# Altium PCB Sampler.PCBDOC (part 5 of 11)
Units mm, origin at the board's own origin, x right, y up, seen from the top; angles counter-clockwise.
Board outline 222.9 x 100 mm, 4 copper layers (L1, P2, L3, L4), stack 1.6 mm thick; 754 components, 442 nets, 2347 pads, 1230 vias.
Unrouted connection lines stored in the file: 10.
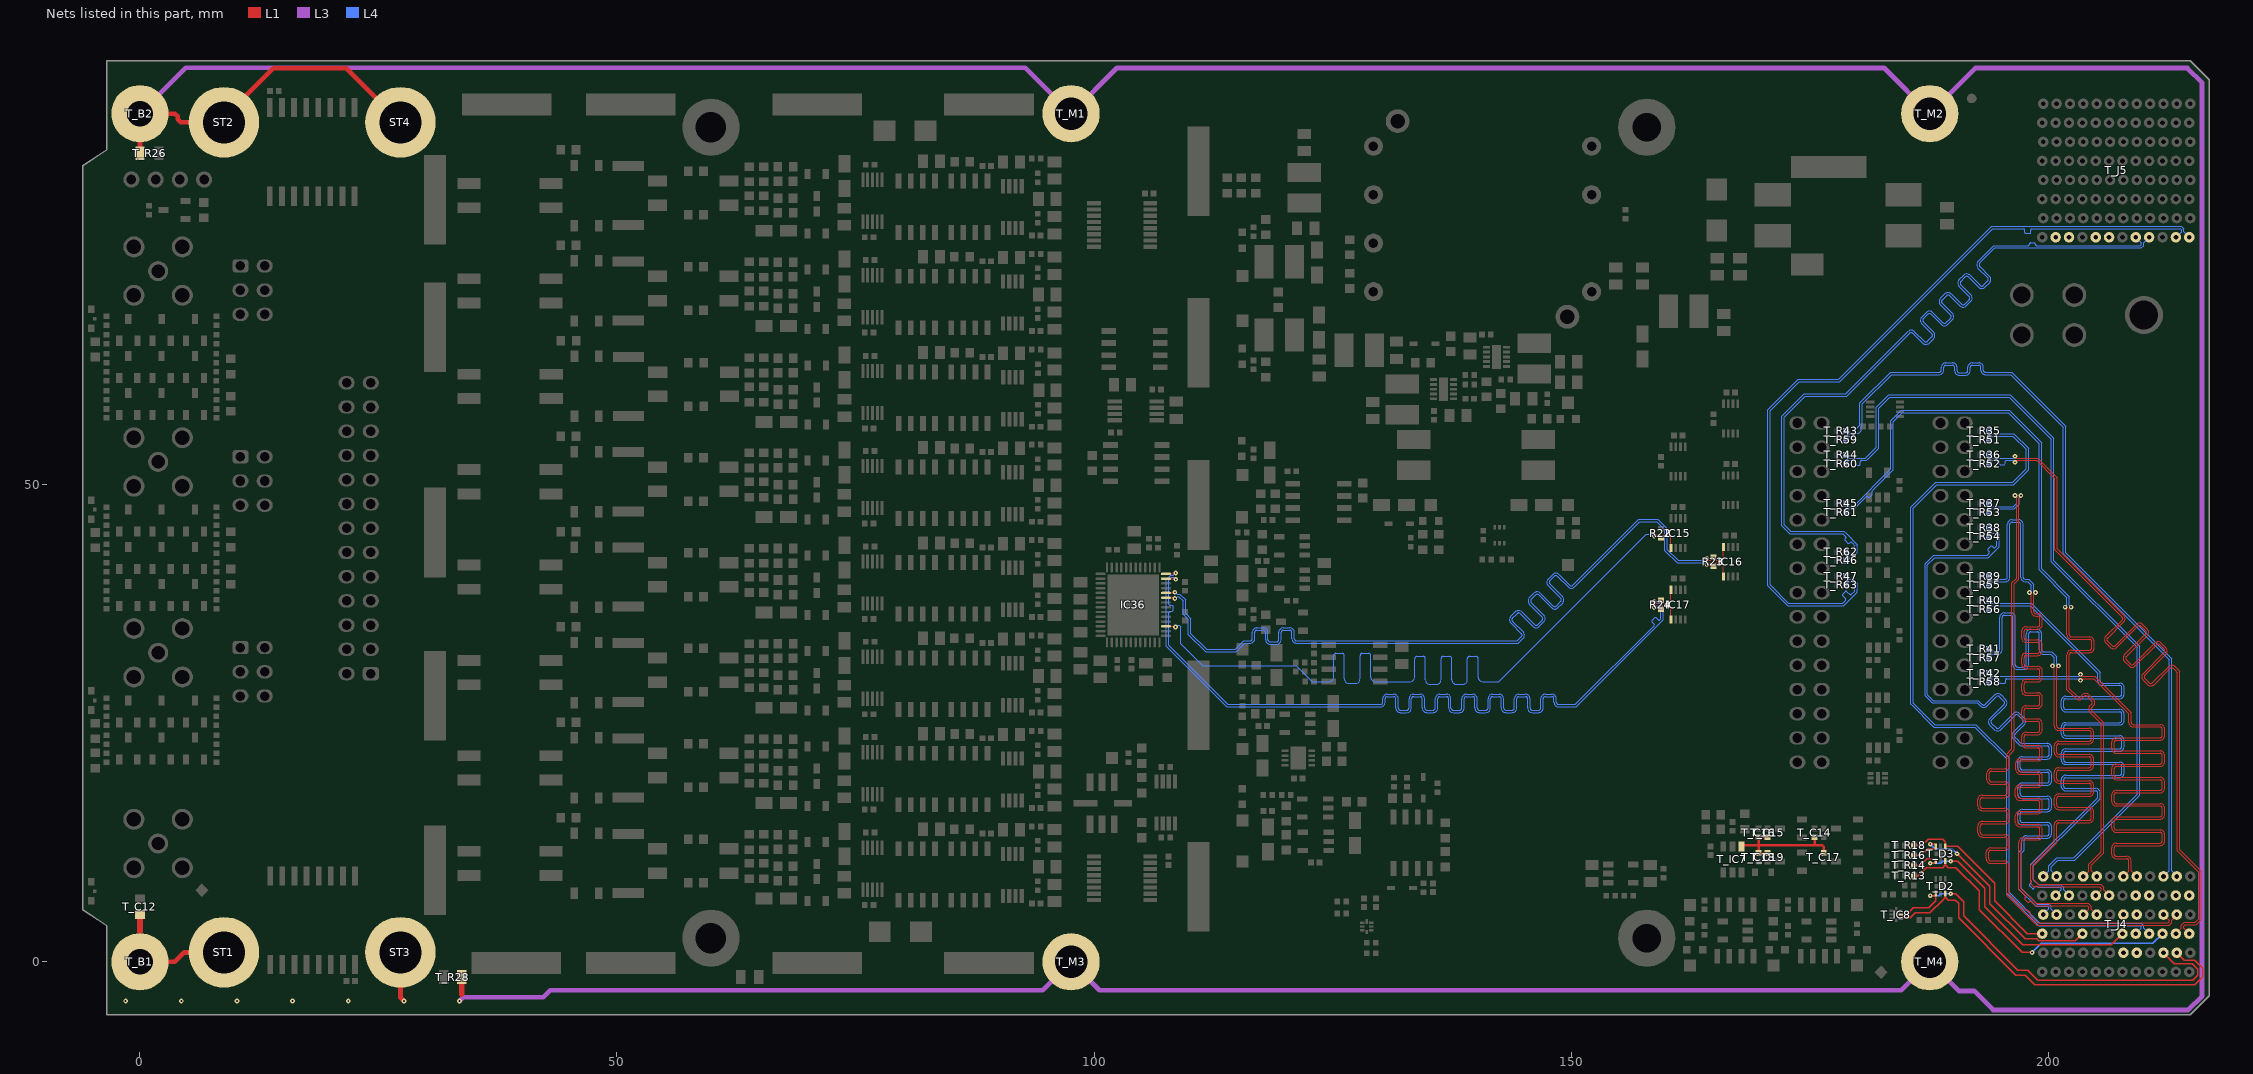
[diagram p6: the nets of this part, all layers, seen from the top]

## Via types
v1: diameter 0.5, hole 0.2, L1 to L4, tented both sides, 1208 vias
v2: diameter 1, hole 0.6, L1 to L4, tented both sides, 16 vias
v3: diameter 0.6, hole 0.3, L1 to L4, tented both sides, 6 vias

## Nets (pads, with @x,y where several pads share a name; then routed paths per layer and width w, separated by ;. In a path a pad name is that pad's centre, name@x,y a point inside that pad or via, vN(x,y) a via of type N, cw(c..) or ccw(c..) an arc to the next point about the centre after c; other vN are vias at no path point) (continued)
ADC_SDOB_P: IC15.1 IC36.29 R22.1 | length 91
  L1 w0.127: IC36.29@107.539,35.165 108.468,35.165 v1(108.544,35.089) ; v1(158.722,44.635) 158.904,44.817 159.084,44.817 R22.1@159.427,44.474 ; R22.1@159.447,44.474 159.673,44.701 159.673,44.743 159.748,44.817 160.339,44.817 160.477,44.679 IC15.1@160.477,43.394
  L4 w0.127: v1(108.544,35.089) 108.751,35.296 108.944,35.296 109.075,35.165 109.075,33.353 111.403,31.025 121.2,31.025 122.864,29.361 ; 122.836,29.361 122.864,29.361 ; v1(158.722,44.635) 158.644,44.635 158.461,44.819 157.894,44.819 142.725,29.65 142.436,29.361 140.745,29.361 cw(c140.745,29.841) 140.266,29.841 140.266,31.783 ccw(c140.041,31.783) 140.041,32.008 139.364,32.008 ccw(c139.364,31.783) 139.139,31.783 139.139,29.562 cw(c138.66,29.562) 138.66,29.082 137.983,29.082 cw(c137.983,29.562) 137.504,29.562 137.504,31.783 ccw(c137.279,31.783) 137.279,32.008 136.602,32.008 ccw(c136.602,31.783) 136.377,31.783 136.377,29.562 cw(c135.898,29.562) 135.898,29.082 135.221,29.082 cw(c135.221,29.562) 134.742,29.562 134.742,31.783 ccw(c134.517,31.783) 134.517,32.008 133.84,32.008 ccw(c133.84,31.783) 133.615,31.783 133.615,29.841 cw(c133.136,29.841) 133.136,29.361 132.945,29.361 130.15,29.361 129.488,29.361 cw(c129.488,29.841) 129.009,29.841 129.009,32.105 ccw(c128.784,32.105) 128.784,32.33 128.107,32.33 ccw(c128.107,32.105) 127.882,32.105 127.882,29.662 cw(c127.403,29.662) 127.403,29.182 126.726,29.182 cw(c126.726,29.662) 126.247,29.662 126.247,32.105 ccw(c126.022,32.105) 126.022,32.33 125.345,32.33 ccw(c125.345,32.105) 125.12,32.105 125.12,29.841 cw(c124.641,29.841) 124.641,29.361 124.45,29.361 122.864,29.361
ADC_SDOC_N: IC16.8 IC36.36 R23.2 | length 90.8
  L1 w0.127: IC36.36@107.539,38.665 108.393,38.665 v1(108.469,38.742) ; v1(164.222,42.263) 164.413,42.072 164.584,42.072 R23.2@164.927,42.415 ; R23.2@164.947,42.415 165.174,42.188 165.174,42.146 165.248,42.072 165.844,42.072 165.978,42.206 IC16.8@165.978,43.495
  L4 w0.127: v1(108.469,38.742) 108.531,38.742 108.73,38.542 108.998,38.542 109.613,37.928 109.613,36.512 110.143,35.982 110.143,34.412 111.803,32.753 114.789,32.753 115.69,33.654 116.182,33.654 116.373,33.654 ccw(c116.373,33.879) 116.598,33.879 116.598,34.53 cw(c117.078,34.53) 117.078,35.009 117.754,35.009 cw(c117.754,34.53) 118.233,34.53 118.233,33.765 ccw(c118.459,33.765) 118.459,33.539 119.135,33.539 ccw(c119.135,33.765) 119.36,33.765 119.36,34.53 cw(c119.84,34.53) 119.84,35.009 120.516,35.009 cw(c120.516,34.53) 120.995,34.53 120.995,33.879 ccw(c121.221,33.879) 121.221,33.654 122.025,33.654 144.37,33.654 144.67,33.955 144.805,34.089 ccw(c144.646,34.249) 144.805,34.409 143.686,35.527 cw(c144.025,35.866) 143.685,36.204 144.164,36.683 cw(c144.503,36.344) 144.842,36.683 146.182,35.343 ccw(c146.342,35.502) 146.501,35.343 146.979,35.821 ccw(c146.82,35.981) 146.979,36.14 145.639,37.48 cw(c145.978,37.819) 145.638,38.157 146.117,38.636 cw(c146.456,38.297) 146.795,38.636 148.135,37.296 ccw(c148.295,37.456) 148.454,37.296 148.932,37.774 ccw(c148.773,37.934) 148.932,38.093 147.592,39.433 cw(c147.931,39.772) 147.591,40.11 148.07,40.589 cw(c148.409,40.25) 148.748,40.589 149.867,39.47 ccw(c150.027,39.63) 150.186,39.47 150.808,40.092 157.094,46.378 159.1,46.378 160.1,45.378 160.1,43.212 161.234,42.079 163.961,42.079 164.145,42.263 v1(164.222,42.263)
ADC_SDOC_P: IC16.1 IC36.35 R23.1 | length 90.8
  L1 w0.127: IC36.35@107.539,38.165 108.14,38.165 108.149,38.174 108.384,38.174 v1(108.469,38.089) ; v1(164.222,41.636) 164.404,41.818 164.584,41.818 R23.1@164.927,41.475 ; R23.1@164.947,41.475 165.174,41.701 165.174,41.743 165.248,41.818 165.839,41.818 165.978,41.679 IC16.1@165.978,40.395
  L4 w0.127: v1(108.469,38.089) 108.531,38.089 108.73,38.288 108.893,38.288 109.359,37.823 109.359,36.407 109.889,35.877 109.889,34.307 111.697,32.499 114.894,32.499 115.796,33.4 116.182,33.4 116.373,33.4 ccw(c116.373,33.879) 116.852,33.879 116.852,34.53 cw(c117.078,34.53) 117.078,34.755 117.754,34.755 cw(c117.754,34.53) 117.979,34.53 117.979,33.765 ccw(c118.459,33.765) 118.459,33.285 119.135,33.285 ccw(c119.135,33.765) 119.614,33.765 119.614,34.53 cw(c119.84,34.53) 119.84,34.755 120.516,34.755 cw(c120.516,34.53) 120.741,34.53 120.741,33.879 ccw(c121.221,33.879) 121.221,33.4 122.025,33.4 144.475,33.4 144.85,33.775 144.985,33.91 ccw(c144.646,34.249) 145.022,34.546 145.022,34.55 144.985,34.587 ; 144.985,34.588 143.866,35.707 cw(c144.025,35.866) 143.866,36.025 144.344,36.503 cw(c144.503,36.344) 144.663,36.503 146.003,35.164 ccw(c146.342,35.502) 146.68,35.162 147.159,35.642 ccw(c146.82,35.981) 147.159,36.32 145.819,37.66 cw(c145.978,37.819) 145.819,37.978 146.297,38.456 cw(c146.456,38.297) 146.616,38.456 147.956,37.117 ccw(c148.295,37.456) 148.633,37.115 149.112,37.595 ccw(c148.773,37.934) 149.112,38.273 147.772,39.613 cw(c147.931,39.772) 147.772,39.931 148.25,40.41 cw(c148.409,40.25) 148.569,40.41 149.688,39.291 ccw(c150.027,39.63) 150.366,39.291 150.987,39.912 157.199,46.124 158.994,46.124 159.846,45.272 159.846,43.107 161.128,41.825 163.956,41.825 164.145,41.636 v1(164.222,41.636)
ADC_SDOD_N: IC17.8 IC36.40 R24.2 | length 91.8
  L1 w0.127: IC36.40@107.539,40.665 108.488,40.665 v1(108.564,40.742) ; v1(158.722,37.763) 158.913,37.572 159.084,37.572 R24.2@159.427,37.915 ; R24.2@159.447,37.915 159.673,37.688 159.673,37.646 159.748,37.572 160.343,37.572 160.477,37.706 IC17.8@160.477,38.995
  L4 w0.127: v1(108.564,40.742) 108.502,40.742 108.303,40.542 108.043,40.542 107.581,40.08 107.581,33.074 113.93,26.725 129.842,26.725 130.032,26.725 ccw(c130.032,27.204) 130.512,27.204 130.512,27.577 cw(c130.737,27.577) 130.737,27.802 131.413,27.802 cw(c131.413,27.577) 131.639,27.577 131.639,26.609 ccw(c132.118,26.609) 132.118,26.13 132.794,26.13 ccw(c132.794,26.609) 133.274,26.609 133.274,27.577 cw(c133.499,27.577) 133.499,27.802 134.175,27.802 cw(c134.175,27.577) 134.401,27.577 134.401,26.609 ccw(c134.88,26.609) 134.88,26.13 135.556,26.13 ccw(c135.556,26.609) 136.036,26.609 136.036,27.577 cw(c136.261,27.577) 136.261,27.802 136.937,27.802 cw(c136.937,27.577) 137.163,27.577 137.163,26.609 ccw(c137.642,26.609) 137.642,26.13 138.318,26.13 ccw(c138.318,26.609) 138.798,26.609 138.798,27.577 cw(c139.023,27.577) 139.023,27.802 139.699,27.802 cw(c139.699,27.577) 139.925,27.577 139.925,26.609 ccw(c140.404,26.609) 140.404,26.13 141.08,26.13 ccw(c141.08,26.609) 141.56,26.609 141.56,27.577 cw(c141.785,27.577) 141.785,27.802 142.461,27.802 cw(c142.461,27.577) 142.687,27.577 142.687,26.609 ccw(c143.166,26.609) 143.166,26.13 143.842,26.13 ccw(c143.842,26.609) 144.322,26.609 144.322,27.577 cw(c144.547,27.577) 144.547,27.802 145.223,27.802 cw(c145.223,27.577) 145.449,27.577 145.449,26.609 ccw(c145.928,26.609) 145.928,26.13 146.604,26.13 ccw(c146.604,26.609) 147.084,26.609 147.084,27.577 cw(c147.309,27.577) 147.309,27.802 147.985,27.802 cw(c147.985,27.577) 148.211,27.577 148.211,27.204 ccw(c148.69,27.204) 148.69,26.725 149.628,26.725 150.555,26.725 159.684,35.854 159.684,37.237 159.342,37.578 158.982,37.578 158.798,37.763 v1(158.722,37.763)
ADC_SDOD_P: IC17.1 IC36.39 R24.1 | length 91.7
  L1 w0.127: IC36.39@107.539,40.165 108.488,40.165 v1(108.564,40.089) ; v1(158.722,37.136) 158.904,37.318 159.084,37.318 R24.1@159.427,36.975 ; R24.1@159.447,36.975 159.673,37.201 159.673,37.243 159.748,37.318 160.339,37.318 160.477,37.179 IC17.1@160.477,35.895
  L4 w0.127: v1(108.564,40.089) 108.502,40.089 108.303,40.288 108.149,40.288 107.835,39.974 107.835,37.945 107.835,37.501 107.96,37.376 108.184,37.376 108.309,37.25 108.309,36.874 108.184,36.749 107.96,36.749 107.835,36.623 107.835,35.933 107.835,33.18 114.035,26.979 129.842,26.979 130.032,26.979 ccw(c130.032,27.204) 130.258,27.204 130.258,27.577 cw(c130.737,27.577) 130.737,28.056 131.413,28.056 cw(c131.413,27.577) 131.893,27.577 131.893,26.609 ccw(c132.118,26.609) 132.118,26.384 132.794,26.384 ccw(c132.794,26.609) 133.02,26.609 133.02,27.577 cw(c133.499,27.577) 133.499,28.056 134.175,28.056 cw(c134.175,27.577) 134.655,27.577 134.655,26.609 ccw(c134.88,26.609) 134.88,26.384 135.556,26.384 ccw(c135.556,26.609) 135.782,26.609 135.782,27.577 cw(c136.261,27.577) 136.261,28.056 136.937,28.056 cw(c136.937,27.577) 137.417,27.577 137.417,26.609 ccw(c137.642,26.609) 137.642,26.384 138.318,26.384 ccw(c138.318,26.609) 138.544,26.609 138.544,27.577 cw(c139.023,27.577) 139.023,28.056 139.699,28.056 cw(c139.699,27.577) 140.179,27.577 140.179,26.609 ccw(c140.404,26.609) 140.404,26.384 141.08,26.384 ccw(c141.08,26.609) 141.306,26.609 141.306,27.577 cw(c141.785,27.577) 141.785,28.056 142.461,28.056 cw(c142.461,27.577) 142.941,27.577 142.941,26.609 ccw(c143.166,26.609) 143.166,26.384 143.842,26.384 ccw(c143.842,26.609) 144.068,26.609 144.068,27.577 cw(c144.547,27.577) 144.547,28.056 145.223,28.056 cw(c145.223,27.577) 145.703,27.577 145.703,26.609 ccw(c145.928,26.609) 145.928,26.384 146.604,26.384 ccw(c146.604,26.609) 146.83,26.609 146.83,27.577 cw(c147.309,27.577) 147.309,28.056 147.985,28.056 cw(c147.985,27.577) 148.465,27.577 148.465,27.204 ccw(c148.69,27.204) 148.69,26.979 149.628,26.979 150.45,26.979 158.655,35.184 158.7,35.229 ccw(c158.61,35.319) 158.7,35.408 158.5,35.608 cw(c158.589,35.696) 158.5,35.785 158.766,36.051 cw(c158.855,35.962) 158.944,36.051 159.143,35.852 ccw(c159.233,35.942) 159.323,35.852 159.43,35.959 159.43,36.057 159.43,37.132 159.237,37.324 158.987,37.324 158.798,37.136 v1(158.722,37.136)
BGA0: T_D3.3 T_J4.C3 T_R13.2 | length 32.7
  L1 w0.152: T_R13.2@185.942,9.044 186.399,9.044 187.23,9.875 187.544,9.875 188.944,9.875 189.231,10.161 ; T_D3.3@189.231,10.572 189.231,10.161 ; v1(198.337,0.978) 197.296,0.978 192.791,5.482 192.791,7.434 190.35,9.875 189.864,9.875 189.517,9.875 189.231,10.161
  L4 w0.152: v1(198.337,0.978) 199.309,1.95 211,1.95 T_J4.C3@212,2.95
BGA1: T_D3.1 T_J4.F3 T_R14.2 | length 28.9
  L1 w0.152: T_R14.2@185.942,10.098 186.563,10.098 187.267,10.802 188.157,10.802 188.231,10.729 T_D3.1@188.231,10.572 ; v1(187.654,10.334) T_D3.1@188.26,10.334 ; v1(189.807,10.537) 190.538,10.537 193.341,7.733 193.341,5.782 197.356,1.767 206.617,1.767 T_J4.F3@207.8,2.95
  L4 w0.152: v1(187.654,10.334) 188.759,10.334 188.962,10.537 v1(189.807,10.537)
BGA2: T_D3.6 T_J4.I3 T_R16.2 | length 24.6
  L1 w0.152: T_R16.2@185.942,11.153 186.665,11.153 187.374,11.862 T_D3.6@188.157,11.862 ; v1(187.654,12.331) T_D3.6@188.26,12.331 ; v1(190.47,11.332) 193.899,7.903 193.899,6.11 197.616,2.394 198.809,2.394 199.011,2.192 202.842,2.192 T_J4.I3@203.6,2.95
  L4 w0.152: v1(187.654,12.331) 188.109,11.876 189.926,11.876 v1(190.47,11.332)
BGA3: T_D3.4 T_J4.L3 T_R18.2 | length 19.2
  L1 w0.152: T_R18.2@185.942,12.207 186.79,12.207 187.435,12.853 188.966,12.853 189.231,12.588 T_D3.4@189.231,12.092 190.528,12.092 194.398,8.222 194.398,6.398 197.846,2.95 T_J4.L3@199.4,2.95
BP_CLK.CLK_N: T_J4.F4
BP_CLK.CLK_P: T_J4.E4
BP_I2C.SCL: T_D2.3 T_IC8.6 T_J4.B2 | length 42.3
  L1 w0.152: T_IC8.6@184.566,4.558 185.514,4.558 186.105,5.15 187.618,5.15 188.944,6.476 189.231,6.763 ; T_D2.3@189.231,7.173 189.231,6.763 ; T_J4.B2@213.5,0.95 214.282,0.168 215.378,0.168 216.203,-0.657 216.203,-1.589 215.391,-2.401 198.631,-2.401 197.616,-1.386 196.633,-1.386 190.652,4.596 190.652,6.123 190.299,6.476 189.517,6.476 189.231,6.763
BP_I2C.SDA: T_D2.1 T_IC8.7 T_J4.C2 | length 43.8
  L1 w0.152: T_IC8.7@184.566,4.958 185.207,4.958 185.898,5.65 187.5,5.65 188.231,6.381 T_D2.1@188.231,6.935 ; v1(187.654,6.935) T_D2.1@188.231,6.935 ; T_D2.1@188.157,7.404 188.231,7.33 T_D2.1@188.231,7.173 T_D2.1@188.231,6.935 ; T_D2.1@188.26,6.935 T_D2.1@188.231,6.935 ; v1(189.807,7.138) 190.333,7.138 191.157,6.314 191.157,4.805 196.843,-0.881 197.849,-0.881 198.92,-1.953 215.152,-1.953 215.697,-1.407 215.697,-0.803 215.093,-0.199 213.249,-0.199 T_J4.C2@212.1,0.95
  L4 w0.152: v1(187.654,6.935) 188.523,6.935 188.726,7.138 v1(189.807,7.138)
BP_IO.LVDS_N0: T_J4.E3 T_R51.1 | length 84.2
  L4 w0.127: T_R51.1@193.796,54.749 193.796,54.769 194.117,55.09 196.319,55.09 197.701,53.709 197.701,51.658 196.293,50.25 188.208,50.25 188.06,50.101 185.761,47.803 185.613,47.654 185.613,27.023 185.761,26.875 187.887,24.749 188.036,24.6 192.333,24.6 195.666,21.267 195.666,11.989 195.666,7.165 195.815,7.016 198.879,3.952 199.028,3.803 209.681,3.803 209.793,3.691 209.793,3.543 T_J4.E3@209.2,2.95
BP_IO.LVDS_N1: T_J4.B3 T_R52.1 | length 84
  L1 w0.127: v1(196.551,52.364) 196.551,52.374 196.728,52.55 198.805,52.55 200.724,50.632 200.724,43.167 206.856,37.035 207.754,36.137 cw(c207.595,35.977) 207.755,35.817 206.059,34.121 ; 206.058,34.121 ccw(c206.397,33.781) 206.058,33.442 206.536,32.964 ccw(c206.875,33.303) 207.214,32.964 209.427,35.177 cw(c209.586,35.017) 209.745,35.176 210.222,34.699 ; 208.011,32.168 ccw(c208.35,31.828) 208.011,31.489 208.489,31.011 ccw(c208.828,31.35) 209.167,31.011 211.38,33.224 cw(c211.539,33.064) 211.698,33.223 212.175,32.746 cw(c212.017,32.586) 212.176,32.427 209.965,30.215 ; 208.012,32.168 210.223,34.38 ccw(c210.064,34.539) 210.223,34.699 ; 209.964,30.215 ccw(c210.303,29.875) 209.964,29.536 210.442,29.058 ccw(c210.781,29.397) 211.12,29.058 212.817,30.755 cw(c212.976,30.596) 213.136,30.755 213.27,30.62 213.571,30.32 213.571,11.645 215.811,9.405 215.811,4.492 215.446,4.127 214.296,4.127 213.984,3.814 213.984,3.534 T_J4.B3@213.4,2.95
  L4 w0.127: T_R52.1@193.796,52.209 193.796,52.229 194.117,52.55 194.122,52.55 194.813,52.55 194.907,52.456 194.907,52.211 195.001,52.117 195.44,52.117 195.534,52.211 195.534,52.456 195.628,52.55 195.751,52.55 196.375,52.55 196.551,52.374 v1(196.551,52.364)
BP_IO.LVDS_N2: T_J4.C4 T_R53.1 | length 84.4
  L1 w0.127: v1(197.151,48.882) 197.151,48.807 196.953,48.609 196.953,40.119 196.476,39.642 196.476,22.222 195.927,21.673 195.927,21.113 195.927,20.464 cw(c195.448,20.464) 195.448,19.984 194.07,19.984 ccw(c194.07,19.759) 193.844,19.759 193.844,19.083 ccw(c194.07,19.083) 194.07,18.857 195.484,18.857 cw(c195.484,18.378) 195.964,18.378 195.964,17.702 cw(c195.484,17.702) 195.484,17.222 193.124,17.222 ccw(c193.124,16.997) 192.899,16.997 192.899,16.321 ccw(c193.124,16.321) 193.124,16.095 195.484,16.095 cw(c195.484,15.616) 195.964,15.616 195.964,14.94 cw(c195.484,14.94) 195.484,14.46 193.124,14.46 ccw(c193.124,14.235) 192.899,14.235 192.899,13.559 ccw(c193.124,13.559) 193.124,13.333 195.484,13.333 cw(c195.484,12.854) 195.964,12.854 195.964,12.178 cw(c195.484,12.178) 195.484,11.698 194.003,11.698 ccw(c194.003,11.473) 193.777,11.473 193.777,10.797 ccw(c194.003,10.797) 194.003,10.571 195.448,10.571 cw(c195.448,10.092) 195.927,10.092 195.927,9.901 195.927,7.083 197.244,5.766 197.289,5.721 197.54,5.469 197.673,5.469 197.684,5.481 197.818,5.481 198.128,5.17 198.128,5.037 198.117,5.026 198.117,4.893 198.56,4.45 198.605,4.405 198.913,4.097 212.581,4.097 212.693,4.209 212.693,4.357 T_J4.C4@212.1,4.95
  L4 w0.127: T_R53.1@193.796,47.129 193.796,47.149 194.117,47.47 196.449,47.47 196.965,47.986 196.965,48.705 197.141,48.882 v1(197.151,48.882)
BP_IO.LVDS_N3: T_J4.L4 T_R54.1 | length 89.3
  L4 w0.127: T_R54.1@193.796,44.589 193.796,44.609 194.117,44.93 194.392,44.93 194.65,44.672 194.65,43.785 194.65,43.63 194.449,43.428 cw(c194.359,43.518) 194.269,43.428 194.154,43.544 ccw(c194.065,43.455) 193.976,43.544 193.71,43.278 ccw(c193.799,43.189) 193.71,43.101 193.826,42.985 cw(c193.736,42.895) 193.826,42.806 193.781,42.761 193.647,42.627 188.002,42.627 187.108,41.733 187.108,27.867 187.839,27.136 192.589,27.136 192.788,26.937 192.886,26.839 192.923,26.802 ccw(c193.262,27.141) 193.601,26.802 194.589,27.791 cw(c194.748,27.631) 194.908,27.789 195.385,27.313 cw(c195.226,27.152) 195.385,26.993 193.891,25.499 ccw(c194.229,25.159) 193.89,24.82 194.368,24.342 ccw(c194.707,24.681) 195.046,24.342 196.542,25.838 cw(c196.701,25.678) 196.861,25.836 ; 196.861,25.836 197.338,25.36 ; 196.874,22.851 196.761,22.964 196.743,22.982 196.724,23.001 196.645,23.08 196.351,23.374 cw(c196.69,23.713) 196.351,24.052 197.338,25.04 ccw(c197.179,25.199) 197.338,25.359 ; 196.875,22.85 ccw(c197.389,23.367) 197.389,22.638 199.9,22.638 cw(c199.9,22.413) 200.125,22.413 200.125,21.736 cw(c199.9,21.736) 199.9,21.511 197.304,21.511 ccw(c197.304,21.032) 196.825,21.032 196.825,20.355 ccw(c197.304,20.355) 197.304,19.876 199.9,19.876 cw(c199.9,19.651) 200.125,19.651 200.125,18.974 cw(c199.9,18.974) 199.9,18.749 197.304,18.749 ccw(c197.304,18.27) 196.825,18.27 196.825,17.593 ccw(c197.304,17.593) 197.304,17.114 199.9,17.114 cw(c199.9,16.889) 200.125,16.889 200.125,16.212 cw(c199.9,16.212) 199.9,15.987 197.304,15.987 ccw(c197.304,15.508) 196.825,15.508 196.825,14.831 ccw(c197.304,14.831) 197.304,14.352 199.9,14.352 cw(c199.9,14.127) 200.125,14.127 200.125,13.45 cw(c199.9,13.45) 199.9,13.225 197.726,13.225 ccw(c197.726,12.746) 197.247,12.746 197.247,11.781 196.931,11.465 196.931,11.067 196.931,7.618 198.745,5.803 199.981,5.803 200.093,5.691 200.093,5.543 T_J4.L4@199.5,4.95
BP_IO.LVDS_N4: T_J4.I4 T_R55.1 | length 90.2
  L1 w0.127: v1(198.059,38.699) 198.07,38.699 198.246,38.522 198.246,36.917 198.246,36.727 ccw(c198.725,36.727) 198.725,36.247 198.913,36.247 cw(c198.913,36.022) 199.139,36.022 199.139,35.346 cw(c198.913,35.346) 198.913,35.12 197.709,35.12 ccw(c197.709,34.641) 197.229,34.641 197.229,33.965 ccw(c197.709,33.965) 197.709,33.485 198.913,33.485 cw(c198.913,33.26) 199.139,33.26 199.139,32.584 cw(c198.913,32.584) 198.913,32.358 197.709,32.358 ccw(c197.709,31.879) 197.229,31.879 197.229,31.203 ccw(c197.709,31.203) 197.709,30.723 198.913,30.723 cw(c198.913,30.498) 199.139,30.498 199.139,29.822 cw(c198.913,29.822) 198.913,29.596 197.709,29.596 ccw(c197.709,29.117) 197.229,29.117 197.229,28.441 ccw(c197.709,28.441) 197.709,27.961 198.913,27.961 cw(c198.913,27.736) 199.139,27.736 199.139,27.06 cw(c198.913,27.06) 198.913,26.834 197.709,26.834 ccw(c197.709,26.355) 197.229,26.355 197.229,25.679 ccw(c197.709,25.679) 197.709,25.199 198.913,25.199 cw(c198.913,24.974) 199.139,24.974 199.139,24.298 cw(c198.913,24.298) 198.913,24.072 197.709,24.072 ccw(c197.709,23.593) 197.229,23.593 197.229,22.917 ccw(c197.709,22.917) 197.709,22.437 198.913,22.437 cw(c198.913,22.212) 199.139,22.212 199.139,21.536 cw(c198.913,21.536) 198.913,21.31 197.095,21.31 ccw(c197.095,20.831) 196.616,20.831 196.616,20.155 ccw(c197.095,20.155) 197.095,19.675 198.913,19.675 cw(c198.913,19.45) 199.139,19.45 199.139,18.774 cw(c198.913,18.774) 198.913,18.548 197.053,18.548 ccw(c197.053,18.069) 196.574,18.069 196.574,17.393 ccw(c197.053,17.393) 197.053,16.913 198.913,16.913 cw(c198.913,16.688) 199.139,16.688 199.139,16.012 cw(c198.913,16.012) 198.913,15.786 197.053,15.786 ccw(c197.053,15.307) 196.574,15.307 196.574,14.631 ccw(c197.053,14.631) 197.053,14.151 198.913,14.151 cw(c198.913,13.926) 199.139,13.926 199.139,13.25 cw(c198.913,13.25) 198.913,13.024 197.425,13.024 ccw(c197.425,12.545) 196.946,12.545 196.946,10.175 196.946,7.579 197.1,7.425 197.145,7.38 197.614,6.911 cw(c197.524,6.821) 197.614,6.731 197.589,6.706 ccw(c197.677,6.617) 197.589,6.528 197.855,6.262 ccw(c197.943,6.351) 198.032,6.262 198.058,6.288 cw(c198.147,6.198) 198.237,6.288 198.282,6.243 198.652,5.873 204.099,5.873 204.262,5.709 204.262,5.512 T_J4.I4@203.7,4.95
  L4 w0.127: T_R55.1@193.796,39.509 193.796,39.529 194.117,39.85 195.333,39.85 195.523,39.85 ccw(c195.523,40.33) 196.003,40.33 196.003,45.861 cw(c196.228,45.861) 196.228,46.086 196.904,46.086 cw(c196.904,45.861) 197.13,45.861 197.13,40.33 ccw(c197.609,40.33) 197.609,39.85 197.86,39.85 198.232,39.479 198.246,39.465 198.246,38.875 198.07,38.699 v1(198.059,38.699)
BP_IO.LVDS_N5: T_J4.K5 T_R56.1 | length 92.5
  L4 w0.127: T_R56.1@193.796,36.969 193.796,36.989 194.117,37.31 198.138,37.31 205.221,30.228 205.221,29.641 205.221,29.45 ccw(c205.7,29.45) 205.7,28.971 207.506,28.971 cw(c207.506,28.745) 207.732,28.745 207.732,28.069 cw(c207.506,28.069) 207.506,27.844 201.856,27.844 ccw(c201.856,27.364) 201.376,27.364 201.376,26.688 ccw(c201.856,26.688) 201.856,26.209 207.506,26.209 cw(c207.506,25.983) 207.732,25.983 207.732,25.307 cw(c207.506,25.307) 207.506,25.082 201.856,25.082 ccw(c201.856,24.602) 201.376,24.602 201.376,23.926 ccw(c201.856,23.926) 201.856,23.447 207.506,23.447 cw(c207.506,23.221) 207.732,23.221 207.732,22.545 cw(c207.506,22.545) 207.506,22.32 201.856,22.32 ccw(c201.856,21.84) 201.376,21.84 201.376,21.164 ccw(c201.856,21.164) 201.856,20.685 207.506,20.685 cw(c207.506,20.459) 207.732,20.459 207.732,19.783 cw(c207.506,19.783) 207.506,19.558 201.856,19.558 ccw(c201.856,19.078) 201.376,19.078 201.376,18.402 ccw(c201.856,18.402) 201.856,17.923 204.996,17.923 cw(c204.996,17.697) 205.221,17.697 205.221,17.216 203.905,15.9 198.208,10.203 198.208,8.866 198.208,8.502 198.23,8.479 cw(c198.141,8.389) 198.23,8.299 198.071,8.14 ccw(c198.16,8.052) 198.071,7.963 198.337,7.697 ccw(c198.426,7.786) 198.515,7.697 198.674,7.856 cw(c198.764,7.766) 198.853,7.856 198.898,7.811 198.906,7.803 201.281,7.803 201.393,7.691 201.393,7.543 T_J4.K5@200.8,6.95
BP_IO.LVDS_N6: T_J4.H5 T_R57.1 | length 84.2
  L1 w0.127: v1(200.467,31.024) 200.477,31.024 200.653,30.847 200.653,30 200.653,24.726 ccw(c201.133,24.726) 201.133,24.247 204.305,24.247 cw(c204.305,24.022) 204.531,24.022 204.531,23.345 cw(c204.305,23.345) 204.305,23.12 201.127,23.12 ccw(c201.127,22.641) 200.648,22.641 200.648,21.964 ccw(c201.127,21.964) 201.127,21.485 204.305,21.485 cw(c204.305,21.26) 204.531,21.26 204.531,20.583 cw(c204.305,20.583) 204.305,20.358 201.127,20.358 ccw(c201.127,19.879) 200.648,19.879 200.648,19.202 ccw(c201.127,19.202) 201.127,18.723 204.305,18.723 cw(c204.305,18.498) 204.531,18.498 204.531,17.821 cw(c204.305,17.821) 204.305,17.596 201.127,17.596 ccw(c201.127,17.117) 200.648,17.117 200.648,16.44 ccw(c201.127,16.44) 201.127,15.961 204.305,15.961 cw(c204.305,15.736) 204.531,15.736 204.531,15.059 cw(c204.305,15.059) 204.305,14.834 201.133,14.834 ccw(c201.133,14.355) 200.653,14.355 200.653,12.783 200.653,12.566 198.213,10.125 198.213,8.919 198.213,8.528 198.231,8.51 cw(c198.141,8.42) 198.231,8.33 198.22,8.32 ccw(c198.309,8.231) 198.22,8.142 198.486,7.876 ccw(c198.575,7.965) 198.663,7.876 198.674,7.887 cw(c198.764,7.797) 198.854,7.887 198.868,7.873 198.93,7.873 205.399,7.873 205.562,7.709 205.562,7.512 T_J4.H5@205,6.95
  L4 w0.127: T_R57.1@193.796,31.889 193.796,31.909 194.117,32.23 194.525,32.23 194.716,32.23 ccw(c194.716,32.71) 195.195,32.71 195.195,36.105 cw(c195.42,36.105) 195.42,36.33 196.097,36.33 cw(c196.097,36.105) 196.322,36.105 196.322,31.127 ccw(c196.801,31.127) 196.801,30.647 197.478,30.647 ccw(c197.478,31.127) 197.957,31.127 197.957,34.367 cw(c198.182,34.367) 198.182,34.592 198.859,34.592 cw(c198.859,34.367) 199.084,34.367 199.084,32.71 ccw(c199.563,32.71) 199.563,32.23 200.285,32.23 200.475,32.041 200.653,31.863 200.653,31.2 200.477,31.024 v1(200.467,31.024)
BP_IO.LVDS_N7: T_J4.F6 T_R58.1 | length 84.2
  L1 w0.127: v1(203.401,29.504) 203.401,29.514 203.578,29.69 204.773,29.69 208.462,26.001 208.462,25.289 208.462,25.098 ccw(c208.942,25.098) 208.942,24.619 211.737,24.619 cw(c211.737,24.393) 211.963,24.393 211.963,23.717 cw(c211.737,23.717) 211.737,23.492 207.154,23.492 ccw(c207.154,23.012) 206.675,23.012 206.675,22.336 ccw(c207.154,22.336) 207.154,21.857 211.737,21.857 cw(c211.737,21.631) 211.963,21.631 211.963,20.955 cw(c211.737,20.955) 211.737,20.73 207.154,20.73 ccw(c207.154,20.25) 206.675,20.25 206.675,19.574 ccw(c207.154,19.574) 207.154,19.095 211.737,19.095 cw(c211.737,18.869) 211.963,18.869 211.963,18.193 cw(c211.737,18.193) 211.737,17.968 207.154,17.968 ccw(c207.154,17.488) 206.675,17.488 206.675,16.812 ccw(c207.154,16.812) 207.154,16.333 211.737,16.333 cw(c211.737,16.107) 211.963,16.107 211.963,15.431 cw(c211.737,15.431) 211.737,15.206 207.154,15.206 ccw(c207.154,14.726) 206.675,14.726 206.675,14.05 ccw(c207.154,14.05) 207.154,13.571 211.737,13.571 cw(c211.737,13.345) 211.963,13.345 211.963,12.669 cw(c211.737,12.669) 211.737,12.444 207.154,12.444 ccw(c207.154,11.964) 206.675,11.964 206.675,11.288 ccw(c207.154,11.288) 207.154,10.809 208.237,10.809 cw(c208.237,10.583) 208.462,10.583 208.462,10.004 208.462,9.512 T_J4.F6@207.9,8.95
  L4 w0.127: T_R58.1@193.796,29.349 193.796,29.369 194.1,29.673 194.117,29.69 194.791,29.69 cw(c194.791,29.563) 194.918,29.563 194.918,29.305 ccw(c195.043,29.305) 195.043,29.179 195.419,29.179 ccw(c195.419,29.305) 195.545,29.305 195.545,29.563 cw(c195.672,29.563) 195.672,29.69 195.971,29.69 203.225,29.69 203.401,29.514 v1(203.401,29.504)
BP_IO.LVDS_N8: T_J4.C6 T_R59.1 | length 84.3
  L4 w0.127: T_R59.1@178.796,54.749 178.796,54.769 179.008,54.981 179.117,55.09 179.47,55.09 179.798,55.419 179.975,55.419 179.987,55.407 180.164,55.407 180.43,55.673 180.43,55.85 180.419,55.862 180.419,56.039 180.527,56.148 180.527,56.187 180.527,58.479 183.596,61.549 188.409,61.549 188.599,61.549 ccw(c188.599,62.028) 189.079,62.028 189.079,62.309 cw(c189.304,62.309) 189.304,62.534 189.98,62.534 cw(c189.98,62.309) 190.206,62.309 190.206,61.967 ccw(c190.685,61.967) 190.685,61.487 191.361,61.487 ccw(c191.361,61.967) 191.841,61.967 191.841,62.309 cw(c192.066,62.309) 192.066,62.534 192.742,62.534 cw(c192.742,62.309) 192.968,62.309 192.968,62.028 ccw(c193.447,62.028) 193.447,61.549 195.128,61.549 196.089,61.549 201.6,56.038 201.6,42.766 212.693,31.672 212.693,9.543 T_J4.C6@212.1,8.95
BP_IO.LVDS_N9: T_J4.L6 T_R60.1 | length 84.2
  L4 w0.127: T_R60.1@178.796,52.209 178.796,52.229 179.086,52.519 179.117,52.55 179.676,52.55 cw(c179.676,52.423) 179.803,52.423 179.803,52.179 ccw(c179.909,52.179) 179.909,52.073 180.225,52.073 ccw(c180.225,52.179) 180.33,52.179 180.33,52.423 cw(c180.457,52.423) 180.457,52.55 180.735,52.55 180.962,52.55 181.111,52.699 182.103,53.691 182.252,53.84 182.252,58.04 183.412,59.2 195.949,59.2 200.357,54.792 200.357,41.959 209.359,32.957 209.359,17.554 202.698,10.893 200.923,10.893 200.093,10.064 200.093,9.543 T_J4.L6@199.5,8.95
BP_IO.LVDS_N10: T_J4.I6 T_R61.1 | length 84.2
  L1 w0.127: v1(201.798,37.174) 201.809,37.174 201.985,36.997 201.985,34.469 201.985,34.278 ccw(c202.464,34.278) 202.464,33.799 204.35,33.799 cw(c204.35,33.573) 204.576,33.573 204.576,32.897 cw(c204.35,32.897) 204.35,32.672 202.464,32.672 ccw(c202.464,32.192) 201.985,32.192 201.985,31.538 201.985,28.54 202.625,27.9 202.778,27.747 202.875,27.65 202.912,27.613 ccw(c203.251,27.952) 203.59,27.613 203.788,27.811 cw(c203.948,27.651) 204.107,27.811 204.585,27.332 cw(c204.426,27.173) 204.585,27.014 ; T_J4.I6@203.7,8.95 204.262,9.512 204.262,10.222 205.575,11.534 205.575,24.95 205.453,25.072 205.355,25.17 204.387,26.138 cw(c204.726,26.477) 204.387,26.816 204.585,27.013
  L4 w0.127: T_R61.1@178.796,47.129 178.796,47.149 179.117,47.47 179.675,47.47 180.44,48.235 180.928,48.723 cw(c181.018,48.634) 181.108,48.723 181.12,48.711 ccw(c181.209,48.8) 181.297,48.711 181.563,48.977 ccw(c181.475,49.066) 181.563,49.154 181.551,49.167 cw(c181.641,49.257) 181.551,49.346 181.748,49.544 183.77,51.566 183.77,56.63 184.694,57.554 195.805,57.554 199.065,54.294 199.065,41.076 201.985,38.156 201.985,37.35 201.809,37.174 v1(201.798,37.174)
BP_IO.LVDS_N11: T_J5.E1 T_R62.1 | length 84.1
  L4 w0.127: T_R62.1@178.796,42.971 178.796,42.951 179.117,42.629 179.418,42.629 179.651,42.862 179.741,42.953 179.741,43.621 179.456,43.906 179.411,43.951 ccw(c179.321,43.861) 179.231,43.951 179.178,43.898 cw(c179.09,43.986) 179.001,43.898 178.735,44.164 cw(c178.824,44.252) 178.735,44.341 178.788,44.394 ccw(c178.698,44.484) 178.788,44.574 178.688,44.673 178.643,44.718 178.485,44.876 172.902,44.876 172.085,45.694 172.085,47.284 172.09,47.289 172.09,57.182 174.437,59.529 178.779,59.529 184.334,65.084 185.319,66.069 cw(c185.658,65.73) 185.955,66.106 185.96,66.106 185.997,66.07 ; 185.997,66.069 187.034,65.032 ccw(c187.193,65.192) 187.353,65.032 187.831,65.511 ccw(c187.671,65.67) 187.83,65.83 186.76,66.9 cw(c187.098,67.24) 186.76,67.58 187.238,68.057 cw(c187.577,67.718) 187.874,68.094 187.878,68.094 188.987,66.985 ccw(c189.146,67.145) 189.306,66.985 189.784,67.464 ccw(c189.624,67.623) 189.783,67.783 ; 189.783,67.783 188.713,68.853 cw(c189.051,69.193) 188.713,69.533 189.191,70.01 cw(c189.53,69.671) 189.827,70.047 189.831,70.047 190.94,68.938 ccw(c191.099,69.098) 191.259,68.938 191.737,69.417 ccw(c191.577,69.576) 191.737,69.736 ; 191.736,69.736 190.666,70.806 cw(c191.004,71.146) 190.666,71.486 191.144,71.963 cw(c191.483,71.624) 191.78,72 191.784,72 192.893,70.891 ccw(c193.052,71.051) 193.212,70.891 193.69,71.37 ccw(c193.53,71.529) 193.69,71.689 ; 193.689,71.689 192.653,72.725 cw(c192.992,73.064) 192.653,73.403 192.788,73.538 194.326,75.076 197.858,75.076 197.921,75.076 ccw(c197.921,75.203) 198.048,75.203 198.048,75.226 cw(c198.174,75.226) 198.174,75.352 198.55,75.352 cw(c198.55,75.226) 198.675,75.226 198.675,75.203 ccw(c198.802,75.203) 198.802,75.076 199.18,75.076 209.681,75.076 209.793,75.188 209.793,75.357 T_J5.E1@209.2,75.95
BP_IO.LVDS_N12: T_J5.B1 T_R63.1 | length 84.2
  L4 w0.127: T_R63.1@178.796,39.509 178.796,39.529 179.117,39.85 179.418,39.85 179.651,39.617 179.741,39.527 179.741,39.06 179.741,38.859 179.399,38.517 cw(c179.309,38.607) 179.219,38.517 178.926,38.811 ccw(c178.837,38.722) 178.748,38.811 178.482,38.545 ccw(c178.571,38.456) 178.482,38.367 178.776,38.074 cw(c178.686,37.984) 178.776,37.894 178.486,37.604 178.342,37.604 172.795,37.604 170.875,39.523 170.875,57.747 173.945,60.817 178.188,60.817 194.195,76.824 196.743,76.824 197.433,76.824 cw(c197.433,76.697) 197.56,76.697 197.56,76.467 ccw(c197.686,76.467) 197.686,76.342 198.062,76.342 ccw(c198.062,76.467) 198.187,76.467 198.187,76.697 cw(c198.314,76.697) 198.314,76.824 198.85,76.824 199.131,76.824 213.881,76.824 213.993,76.712 213.993,76.543 T_J5.B1@213.4,75.95
BP_IO.LVDS_N13: T_J5.K1
BP_IO.LVDS_N14: T_J5.H1
BP_IO.LVDS_N15: T_J4.F2
BP_IO.LVDS_P0: T_J4.D3 T_R35.1 | length 84.5
  L4 w0.127: T_R35.1@193.796,55.668 193.796,55.648 194.023,55.422 194.043,55.422 194.12,55.344 196.425,55.344 197.955,53.814 197.955,51.552 196.398,49.996 188.314,49.996 185.867,47.549 185.867,27.129 188.141,24.854 192.438,24.854 195.92,21.372 195.92,21.267 195.92,7.27 199.133,4.057 209.786,4.057 210.047,3.796 210.047,3.531 210.6,2.978 T_J4.D3@210.6,2.95
BP_IO.LVDS_P1: T_J4.A3 T_R36.1 | length 83.8
  L1 w0.127: v1(196.551,52.991) 196.551,52.981 196.728,52.804 198.91,52.804 200.978,50.737 200.978,43.272 207.035,37.215 207.934,36.316 ; 207.935,36.315 207.972,36.278 207.972,36.274 cw(c207.595,35.977) 207.934,35.638 206.237,33.94 ccw(c206.397,33.781) 206.237,33.622 206.716,33.144 ccw(c206.875,33.303) 207.034,33.144 209.246,35.355 ; 209.246,35.356 cw(c209.586,35.017) 209.883,35.393 209.887,35.393 209.924,35.357 ; 209.924,35.356 210.403,34.878 ; 210.403,34.877 210.44,34.841 210.44,34.836 cw(c210.064,34.539) 210.403,34.2 208.19,31.987 ccw(c208.35,31.828) 208.19,31.669 208.669,31.191 ccw(c208.828,31.35) 208.987,31.191 211.199,33.402 ; 211.199,33.403 cw(c211.539,33.064) 211.836,33.44 211.84,33.44 211.877,33.404 ; 211.878,33.403 212.356,32.925 ; 212.356,32.924 212.393,32.888 212.393,32.883 cw(c212.017,32.586) 212.356,32.247 210.143,30.034 ccw(c210.303,29.875) 210.143,29.716 210.622,29.238 ccw(c210.781,29.397) 210.94,29.238 212.637,30.935 cw(c212.976,30.596) 213.273,30.972 213.278,30.972 213.315,30.935 ; 213.315,30.935 213.45,30.8 213.751,30.499 213.825,30.425 213.825,11.75 216.065,9.51 216.065,4.387 215.551,3.873 214.401,3.873 214.238,3.709 214.238,3.512 T_J4.A3@214.8,2.95
  L4 w0.127: T_R36.1@193.796,53.128 193.796,53.108 194.023,52.882 194.043,52.882 194.12,52.804 196.375,52.804 196.551,52.981 v1(196.551,52.991)
BP_IO.LVDS_P2: T_J4.B4 T_R37.1 | length 84.6
  L1 w0.127: v1(196.524,48.882) 196.524,48.795 196.699,48.621 196.699,40.224 196.222,39.747 196.222,22.328 195.673,21.778 195.673,21.113 195.673,20.464 cw(c195.448,20.464) 195.448,20.238 194.07,20.238 ccw(c194.07,19.759) 193.59,19.759 193.59,19.083 ccw(c194.07,19.083) 194.07,18.603 195.484,18.603 cw(c195.484,18.378) 195.71,18.378 195.71,17.702 cw(c195.484,17.702) 195.484,17.476 193.124,17.476 ccw(c193.124,16.997) 192.645,16.997 192.645,16.321 ccw(c193.124,16.321) 193.124,15.841 195.484,15.841 cw(c195.484,15.616) 195.71,15.616 195.71,14.94 cw(c195.484,14.94) 195.484,14.714 193.124,14.714 ccw(c193.124,14.235) 192.645,14.235 192.645,13.559 ccw(c193.124,13.559) 193.124,13.079 195.484,13.079 cw(c195.484,12.854) 195.71,12.854 195.71,12.178 cw(c195.484,12.178) 195.484,11.952 194.003,11.952 ccw(c194.003,11.473) 193.523,11.473 193.523,10.797 ccw(c194.003,10.797) 194.003,10.317 195.448,10.317 cw(c195.448,10.092) 195.673,10.092 195.673,9.901 195.673,6.977 198.807,3.843 212.686,3.843 212.947,4.104 212.947,4.369 213.5,4.922 T_J4.B4@213.5,4.95
  L4 w0.127: T_R37.1@193.796,48.048 193.796,48.028 194.023,47.802 194.043,47.802 194.12,47.724 196.344,47.724 196.711,48.091 196.711,48.705 196.535,48.882 v1(196.524,48.882)
BP_IO.LVDS_P3: T_J4.K4 T_R38.1 | length 89.1
  L4 w0.127: T_R38.1@193.796,45.508 193.796,45.488 194.023,45.262 194.043,45.262 194.12,45.184 194.497,45.184 194.904,44.778 194.904,43.524 193.753,42.373 188.107,42.373 187.362,41.628 187.362,27.972 187.944,27.39 192.694,27.39 192.968,27.117 193.065,27.019 193.102,26.982 ccw(c193.262,27.141) 193.421,26.982 194.408,27.969 ; 194.408,27.969 cw(c194.748,27.631) 195.045,28.007 195.05,28.007 195.086,27.97 ; 195.087,27.97 195.565,27.491 ; 195.566,27.491 195.602,27.454 195.602,27.45 cw(c195.226,27.152) 195.565,26.813 194.069,25.317 ccw(c194.229,25.159) 194.07,24.999 194.548,24.521 ccw(c194.707,24.681) 194.867,24.521 196.361,26.016 ; 196.362,26.016 cw(c196.701,25.678) 196.998,26.054 197.003,26.054 197.039,26.017 ; 197.04,26.017 197.518,25.538 ; 197.519,25.538 197.555,25.501 197.555,25.497 cw(c197.179,25.199) 197.518,24.86 196.53,23.873 ccw(c196.69,23.713) 196.53,23.554 196.825,23.259 196.922,23.162 196.952,23.132 197.052,23.032 197.055,23.029 ccw(c197.389,23.367) 197.389,22.892 199.9,22.892 cw(c199.9,22.413) 200.379,22.413 200.379,21.736 cw(c199.9,21.736) 199.9,21.257 197.304,21.257 ccw(c197.304,21.032) 197.079,21.032 197.079,20.355 ccw(c197.304,20.355) 197.304,20.13 199.9,20.13 cw(c199.9,19.651) 200.379,19.651 200.379,18.974 cw(c199.9,18.974) 199.9,18.495 197.304,18.495 ccw(c197.304,18.27) 197.079,18.27 197.079,17.593 ccw(c197.304,17.593) 197.304,17.368 199.9,17.368 cw(c199.9,16.889) 200.379,16.889 200.379,16.212 cw(c199.9,16.212) 199.9,15.733 197.304,15.733 ccw(c197.304,15.508) 197.079,15.508 197.079,14.831 ccw(c197.304,14.831) 197.304,14.606 199.9,14.606 cw(c199.9,14.127) 200.379,14.127 200.379,13.45 cw(c199.9,13.45) 199.9,12.971 197.726,12.971 ccw(c197.726,12.746) 197.501,12.746 197.501,11.676 197.185,11.36 197.185,11.067 197.185,7.723 198.85,6.057 200.086,6.057 200.161,5.983 200.347,5.796 200.347,5.531 200.9,4.978 T_J4.K4@200.9,4.95
BP_IO.LVDS_P4: T_J4.H4 T_R39.1 | length 90.2
  L1 w0.127: v1(198.686,38.699) 198.676,38.699 198.5,38.522 198.5,36.917 198.5,36.727 ccw(c198.725,36.727) 198.725,36.501 198.913,36.501 cw(c198.913,36.022) 199.393,36.022 199.393,35.346 cw(c198.913,35.346) 198.913,34.866 197.709,34.866 ccw(c197.709,34.641) 197.483,34.641 197.483,33.965 ccw(c197.709,33.965) 197.709,33.739 198.913,33.739 cw(c198.913,33.26) 199.393,33.26 199.393,32.584 cw(c198.913,32.584) 198.913,32.104 197.709,32.104 ccw(c197.709,31.879) 197.483,31.879 197.483,31.203 ccw(c197.709,31.203) 197.709,30.977 198.913,30.977 cw(c198.913,30.498) 199.393,30.498 199.393,29.822 cw(c198.913,29.822) 198.913,29.342 197.709,29.342 ccw(c197.709,29.117) 197.483,29.117 197.483,28.441 ccw(c197.709,28.441) 197.709,28.215 198.913,28.215 cw(c198.913,27.736) 199.393,27.736 199.393,27.06 cw(c198.913,27.06) 198.913,26.58 197.709,26.58 ccw(c197.709,26.355) 197.483,26.355 197.483,25.679 ccw(c197.709,25.679) 197.709,25.453 198.913,25.453 cw(c198.913,24.974) 199.393,24.974 199.393,24.298 cw(c198.913,24.298) 198.913,23.818 197.709,23.818 ccw(c197.709,23.593) 197.483,23.593 197.483,22.917 ccw(c197.709,22.917) 197.709,22.691 198.913,22.691 cw(c198.913,22.212) 199.393,22.212 199.393,21.536 cw(c198.913,21.536) 198.913,21.056 197.095,21.056 ccw(c197.095,20.831) 196.87,20.831 196.87,20.155 ccw(c197.095,20.155) 197.095,19.929 198.913,19.929 cw(c198.913,19.45) 199.393,19.45 199.393,18.774 cw(c198.913,18.774) 198.913,18.294 197.053,18.294 ccw(c197.053,18.069) 196.828,18.069 196.828,17.393 ccw(c197.053,17.393) 197.053,17.167 198.913,17.167 cw(c198.913,16.688) 199.393,16.688 199.393,16.012 cw(c198.913,16.012) 198.913,15.532 197.053,15.532 ccw(c197.053,15.307) 196.828,15.307 196.828,14.631 ccw(c197.053,14.631) 197.053,14.405 198.913,14.405 cw(c198.913,13.926) 199.393,13.926 199.393,13.25 cw(c198.913,13.25) 198.913,12.77 197.425,12.77 ccw(c197.425,12.545) 197.2,12.545 197.2,10.175 197.2,7.684 198.757,6.127 204.204,6.127 204.516,5.814 204.516,5.534 T_J4.H4@205.1,4.95
  L4 w0.127: T_R39.1@193.796,40.428 193.796,40.408 194.023,40.182 194.043,40.182 194.12,40.104 195.333,40.104 195.523,40.104 ccw(c195.523,40.33) 195.749,40.33 195.749,45.861 cw(c196.228,45.861) 196.228,46.34 196.904,46.34 cw(c196.904,45.861) 197.384,45.861 197.384,40.33 ccw(c197.609,40.33) 197.609,40.104 197.965,40.104 198.232,39.838 198.5,39.57 198.5,38.875 198.676,38.699 v1(198.686,38.699)
BP_IO.LVDS_P5: T_J4.J5 T_R40.1 | length 92.2
  L4 w0.127: T_R40.1@193.796,37.888 193.796,37.868 194.023,37.642 194.043,37.642 194.12,37.564 198.243,37.564 205.475,30.333 205.475,29.641 205.475,29.45 ccw(c205.7,29.45) 205.7,29.225 207.506,29.225 cw(c207.506,28.745) 207.986,28.745 207.986,28.069 cw(c207.506,28.069) 207.506,27.59 201.856,27.59 ccw(c201.856,27.364) 201.63,27.364 201.63,26.688 ccw(c201.856,26.688) 201.856,26.463 207.506,26.463 cw(c207.506,25.983) 207.986,25.983 207.986,25.307 cw(c207.506,25.307) 207.506,24.828 201.856,24.828 ccw(c201.856,24.602) 201.63,24.602 201.63,23.926 ccw(c201.856,23.926) 201.856,23.701 207.506,23.701 cw(c207.506,23.221) 207.986,23.221 207.986,22.545 cw(c207.506,22.545) 207.506,22.066 201.856,22.066 ccw(c201.856,21.84) 201.63,21.84 201.63,21.164 ccw(c201.856,21.164) 201.856,20.939 207.506,20.939 cw(c207.506,20.459) 207.986,20.459 207.986,19.783 cw(c207.506,19.783) 207.506,19.304 201.856,19.304 ccw(c201.856,19.078) 201.63,19.078 201.63,18.402 ccw(c201.856,18.402) 201.856,18.177 204.996,18.177 cw(c204.996,17.697) 205.475,17.697 205.475,17.111 204.264,15.9 198.462,10.097 198.462,8.607 199.012,8.057 201.386,8.057 201.461,7.983 201.647,7.796 201.647,7.531 202.2,6.978 T_J4.J5@202.2,6.95
BP_IO.LVDS_P6: T_J4.G5 T_R41.1 | length 84.3
  L1 w0.127: v1(201.094,31.024) 201.083,31.024 200.907,30.847 200.907,30 200.907,24.726 ccw(c201.133,24.726) 201.133,24.501 204.305,24.501 cw(c204.305,24.022) 204.785,24.022 204.785,23.345 cw(c204.305,23.345) 204.305,22.866 201.127,22.866 ccw(c201.127,22.641) 200.902,22.641 200.902,21.964 ccw(c201.127,21.964) 201.127,21.739 204.305,21.739 cw(c204.305,21.26) 204.785,21.26 204.785,20.583 cw(c204.305,20.583) 204.305,20.104 201.127,20.104 ccw(c201.127,19.879) 200.902,19.879 200.902,19.202 ccw(c201.127,19.202) 201.127,18.977 204.305,18.977 cw(c204.305,18.498) 204.785,18.498 204.785,17.821 cw(c204.305,17.821) 204.305,17.342 201.127,17.342 ccw(c201.127,17.117) 200.902,17.117 200.902,16.44 ccw(c201.127,16.44) 201.127,16.215 204.305,16.215 cw(c204.305,15.736) 204.785,15.736 204.785,15.059 cw(c204.305,15.059) 204.305,14.58 201.133,14.58 ccw(c201.133,14.355) 200.907,14.355 200.907,12.783 200.907,12.461 198.467,10.02 198.467,8.633 198.973,8.127 205.504,8.127 205.816,7.814 205.816,7.534 T_J4.G5@206.4,6.95
  L4 w0.127: T_R41.1@193.796,32.808 193.796,32.788 194.023,32.562 194.043,32.562 194.12,32.484 194.525,32.484 194.716,32.484 ccw(c194.716,32.71) 194.941,32.71 194.941,36.105 cw(c195.42,36.105) 195.42,36.584 196.097,36.584 cw(c196.097,36.105) 196.576,36.105 196.576,31.127 ccw(c196.801,31.127) 196.801,30.901 197.478,30.901 ccw(c197.478,31.127) 197.703,31.127 197.703,34.367 cw(c198.182,34.367) 198.182,34.846 198.859,34.846 cw(c198.859,34.367) 199.338,34.367 199.338,32.71 ccw(c199.563,32.71) 199.563,32.484 200.391,32.484 200.475,32.4 200.907,31.968 200.907,31.2 201.083,31.024 v1(201.094,31.024)
BP_IO.LVDS_P7: T_J4.E6 T_R42.1 | length 83.8
  L1 w0.127: v1(203.401,30.131) 203.401,30.121 203.578,29.944 204.878,29.944 208.716,26.106 208.716,25.289 208.716,25.098 ccw(c208.942,25.098) 208.942,24.873 211.737,24.873 cw(c211.737,24.393) 212.217,24.393 212.217,23.717 cw(c211.737,23.717) 211.737,23.238 207.154,23.238 ccw(c207.154,23.012) 206.929,23.012 206.929,22.336 ccw(c207.154,22.336) 207.154,22.111 211.737,22.111 cw(c211.737,21.631) 212.217,21.631 212.217,20.955 cw(c211.737,20.955) 211.737,20.476 207.154,20.476 ccw(c207.154,20.25) 206.929,20.25 206.929,19.574 ccw(c207.154,19.574) 207.154,19.349 211.737,19.349 cw(c211.737,18.869) 212.217,18.869 212.217,18.193 cw(c211.737,18.193) 211.737,17.714 207.154,17.714 ccw(c207.154,17.488) 206.929,17.488 206.929,16.812 ccw(c207.154,16.812) 207.154,16.587 211.737,16.587 cw(c211.737,16.107) 212.217,16.107 212.217,15.431 cw(c211.737,15.431) 211.737,14.952 207.154,14.952 ccw(c207.154,14.726) 206.929,14.726 206.929,14.05 ccw(c207.154,14.05) 207.154,13.825 211.737,13.825 cw(c211.737,13.345) 212.217,13.345 212.217,12.669 cw(c211.737,12.669) 211.737,12.19 207.154,12.19 ccw(c207.154,11.964) 206.929,11.964 206.929,11.288 ccw(c207.154,11.288) 207.154,11.063 208.237,11.063 cw(c208.237,10.583) 208.716,10.583 208.716,10.004 208.716,9.534 T_J4.E6@209.3,8.95
  L4 w0.127: T_R42.1@193.796,30.268 193.796,30.248 194.023,30.022 194.043,30.022 194.12,29.944 203.225,29.944 203.401,30.121 v1(203.401,30.131)
BP_IO.LVDS_P8: T_J4.B6 T_R43.1 | length 84.5
  L4 w0.127: T_R43.1@178.796,55.668 178.796,55.648 179.022,55.422 179.042,55.422 179.12,55.344 179.364,55.344 180.273,56.253 180.273,58.585 183.491,61.803 188.409,61.803 188.599,61.803 ccw(c188.599,62.028) 188.825,62.028 188.825,62.309 cw(c189.304,62.309) 189.304,62.788 189.98,62.788 cw(c189.98,62.309) 190.46,62.309 190.46,61.967 ccw(c190.685,61.967) 190.685,61.741 191.361,61.741 ccw(c191.361,61.967) 191.587,61.967 191.587,62.309 cw(c192.066,62.309) 192.066,62.788 192.742,62.788 cw(c192.742,62.309) 193.222,62.309 193.222,62.028 ccw(c193.447,62.028) 193.447,61.803 195.128,61.803 196.194,61.803 201.854,56.143 201.854,42.871 212.947,31.778 212.947,9.531 213.5,8.978 T_J4.B6@213.5,8.95
BP_IO.LVDS_P9: T_J4.K6 T_R44.1 | length 83.8
  L4 w0.127: T_R44.1@178.796,53.128 178.796,53.108 179.022,52.882 179.042,52.882 179.12,52.804 180.735,52.804 180.857,52.804 181.998,53.945 181.998,58.145 183.307,59.454 196.054,59.454 200.611,54.897 200.611,42.064 209.539,33.136 209.613,33.062 209.613,17.449 202.803,10.639 201.028,10.639 200.347,9.958 200.347,9.531 200.9,8.978 T_J4.K6@200.9,8.95
BP_IO.LVDS_P10: T_J4.H6 T_R45.1 | length 84.3
  L1 w0.127: v1(202.425,37.174) 202.415,37.174 202.239,36.997 202.239,34.469 202.239,34.278 ccw(c202.464,34.278) 202.464,34.053 204.35,34.053 cw(c204.35,33.573) 204.83,33.573 204.83,32.897 cw(c204.35,32.897) 204.35,32.418 202.464,32.418 ccw(c202.464,32.192) 202.239,32.192 202.239,31.538 202.239,28.645 202.957,27.927 203.055,27.829 203.092,27.792 ccw(c203.251,27.952) 203.411,27.792 203.609,27.99 cw(c203.948,27.651) 204.287,27.99 204.765,27.512 cw(c204.426,27.173) 204.802,26.876 204.802,26.871 204.567,26.636 ccw(c204.726,26.477) 204.567,26.317 205.535,25.349 205.632,25.252 205.829,25.055 205.829,11.429 204.516,10.116 204.516,9.534 T_J4.H6@205.1,8.95
  L4 w0.127: T_R45.1@178.796,48.048 178.796,48.028 179.022,47.802 179.042,47.802 179.12,47.724 179.57,47.724 183.516,51.671 183.516,56.735 184.589,57.808 195.91,57.808 199.319,54.399 199.319,41.181 202.239,38.261 202.239,37.35 202.415,37.174 v1(202.425,37.174)
BP_IO.LVDS_P11: T_J5.D1 T_R46.1 | length 83.7
  L4 w0.127: T_R46.1@178.796,42.051 T_R46.1@178.796,42.071 179.022,42.298 179.042,42.298 179.12,42.375 179.523,42.375 180.003,42.855 180.003,43.734 178.831,44.906 178.595,45.141 173.012,45.141 172.35,45.803 172.35,47.284 172.344,47.289 172.344,57.077 174.543,59.275 178.884,59.275 184.514,64.905 185.499,65.89 cw(c185.658,65.73) 185.818,65.889 ; 185.818,65.889 186.853,64.854 ccw(c187.193,65.192) 187.533,64.854 188.01,65.331 ccw(c187.671,65.67) 188.048,65.967 188.048,65.972 186.939,67.08 cw(c187.098,67.24) 186.939,67.399 187.417,67.877 cw(c187.577,67.718) 187.736,67.877 ; 187.737,67.876 188.806,66.807 ccw(c189.146,67.145) 189.486,66.807 189.963,67.284 ccw(c189.624,67.623) 190.001,67.92 190.001,67.925 188.892,69.033 cw(c189.051,69.193) 188.892,69.352 189.37,69.83 cw(c189.53,69.671) 189.689,69.83 ; 189.69,69.829 190.759,68.76 ccw(c191.099,69.098) 191.439,68.76 191.916,69.237 ccw(c191.577,69.576) 191.954,69.873 191.954,69.878 190.845,70.986 cw(c191.004,71.146) 190.845,71.305 191.323,71.783 cw(c191.483,71.624) 191.642,71.783 ; 191.643,71.782 192.713,70.713 ccw(c193.052,71.051) 193.392,70.713 193.869,71.19 ccw(c193.53,71.529) 193.907,71.826 193.907,71.831 192.833,72.905 cw(c192.992,73.064) 192.833,73.223 192.967,73.358 194.431,74.822 196.005,74.822 209.786,74.822 210.047,75.083 210.047,75.369 210.6,75.922 T_J5.D1@210.6,75.95
BP_IO.LVDS_P12: T_J5.A1 T_R47.1 | length 84.5
  L4 w0.127: T_R47.1@178.796,40.428 178.796,40.408 179.022,40.182 179.042,40.182 179.12,40.104 179.523,40.104 180.003,39.624 180.003,38.746 178.595,37.338 178.232,37.338 172.701,37.338 170.621,39.418 170.621,57.852 173.84,61.071 178.082,61.071 194.09,77.078 196.743,77.078 213.986,77.078 214.247,76.817 214.247,76.531 214.8,75.978 T_J5.A1@214.8,75.95
BP_IO.LVDS_P13: T_J5.J1
BP_IO.LVDS_P14: T_J5.G1
BP_IO.LVDS_P15: T_J4.E2
BP_MGT_Rx_N: T_J4.E5
BP_MGT_Rx_P: T_J4.D5
BP_MGT_Tx_N: T_J4.B5
BP_MGT_Tx_P: T_J4.A5
CHASSIS: ST1.1 ST2.1 ST3.1 ST4.1 T_B1.1 T_B2.1 T_C12.2 T_M1.1 T_M2.1 T_M3.1 T_M4.1 T_R26.1 T_R28.2 | length 563.4
  L1 w0.5: T_B1.1@0,0 3.652,0 4.643,0.991 ST1.1@5.548,0.991 ; T_R26.1@0,84.748 T_B2.1@0,88.9 3.657,88.9 3.95,88.607 3.95,88.325 4.275,88 8.3,88 13.975,93.675 21.625,93.675 ST4.1@27.3,88 ; ST1.1@8.791,0.991 ST1.1@8.8,1 ; ST3.1@27.3,1 27.3,-3.733 v1(27.667,-4.1)
  L1 w0.6: 0,3.197 T_C12.2@0,4.975 ; 33.724,-3.382 T_R28.2@33.724,-1.604
  L3 w0.5: T_B2.1@0,88.9 4.814,93.714 92.786,93.714 T_M1.1@97.6,88.9 102.39,93.689 182.811,93.689 T_M2.1@187.6,88.9 192.38,93.68 214.615,93.68 216.149,92.146 216.149,-3.588 214.691,-5.046 194.246,-5.046 192.25,-3.05 190.65,-3.05 T_M4.1@187.6,0 184.625,-2.975 100.575,-2.975 T_M3.1@97.6,0 94.625,-2.975 42.992,-2.975 42.25,-3.717 33.883,-3.717 v1(33.5,-4.1)
  other v1: -1.5,-4.1 4.333,-4.1 10.167,-4.1 16,-4.1 21.833,-4.1
CT: T_C14.2 T_C15.2 T_C16.2 T_C17.2 T_C18.2 T_C19.2 T_IC7.4 | length 13.8
  L1 w0.254: T_IC7.4@167.869,12.086 168.022,12.239 169.658,12.239 ; T_C19.2@170.609,11.4 T_C18.2@169.658,11.4 169.658,12.239 ; T_C15.2@170.609,13.077 T_C16.2@169.658,13.077 169.658,12.239 ; T_C14.2@175.542,13.077 175.542,12.254 175.527,12.239 ; T_C17.2@176.493,11.4 176.493,12.057 176.311,12.239 175.527,12.239 ; 169.658,12.239 175.527,12.239